# Altium PCB EMG-Arm-ELEC-V2.0.PcbDoc (part 5 of 5)
Units mil, origin at the board's own origin, x right, y up, seen from the top; angles counter-clockwise.
Board outline 8303.83 x 7532.25 mil, 2 copper layers (Top Layer, Bottom Layer), stack 3.556 mil thick; 263 components, 174 nets, 696 pads, 313 vias.
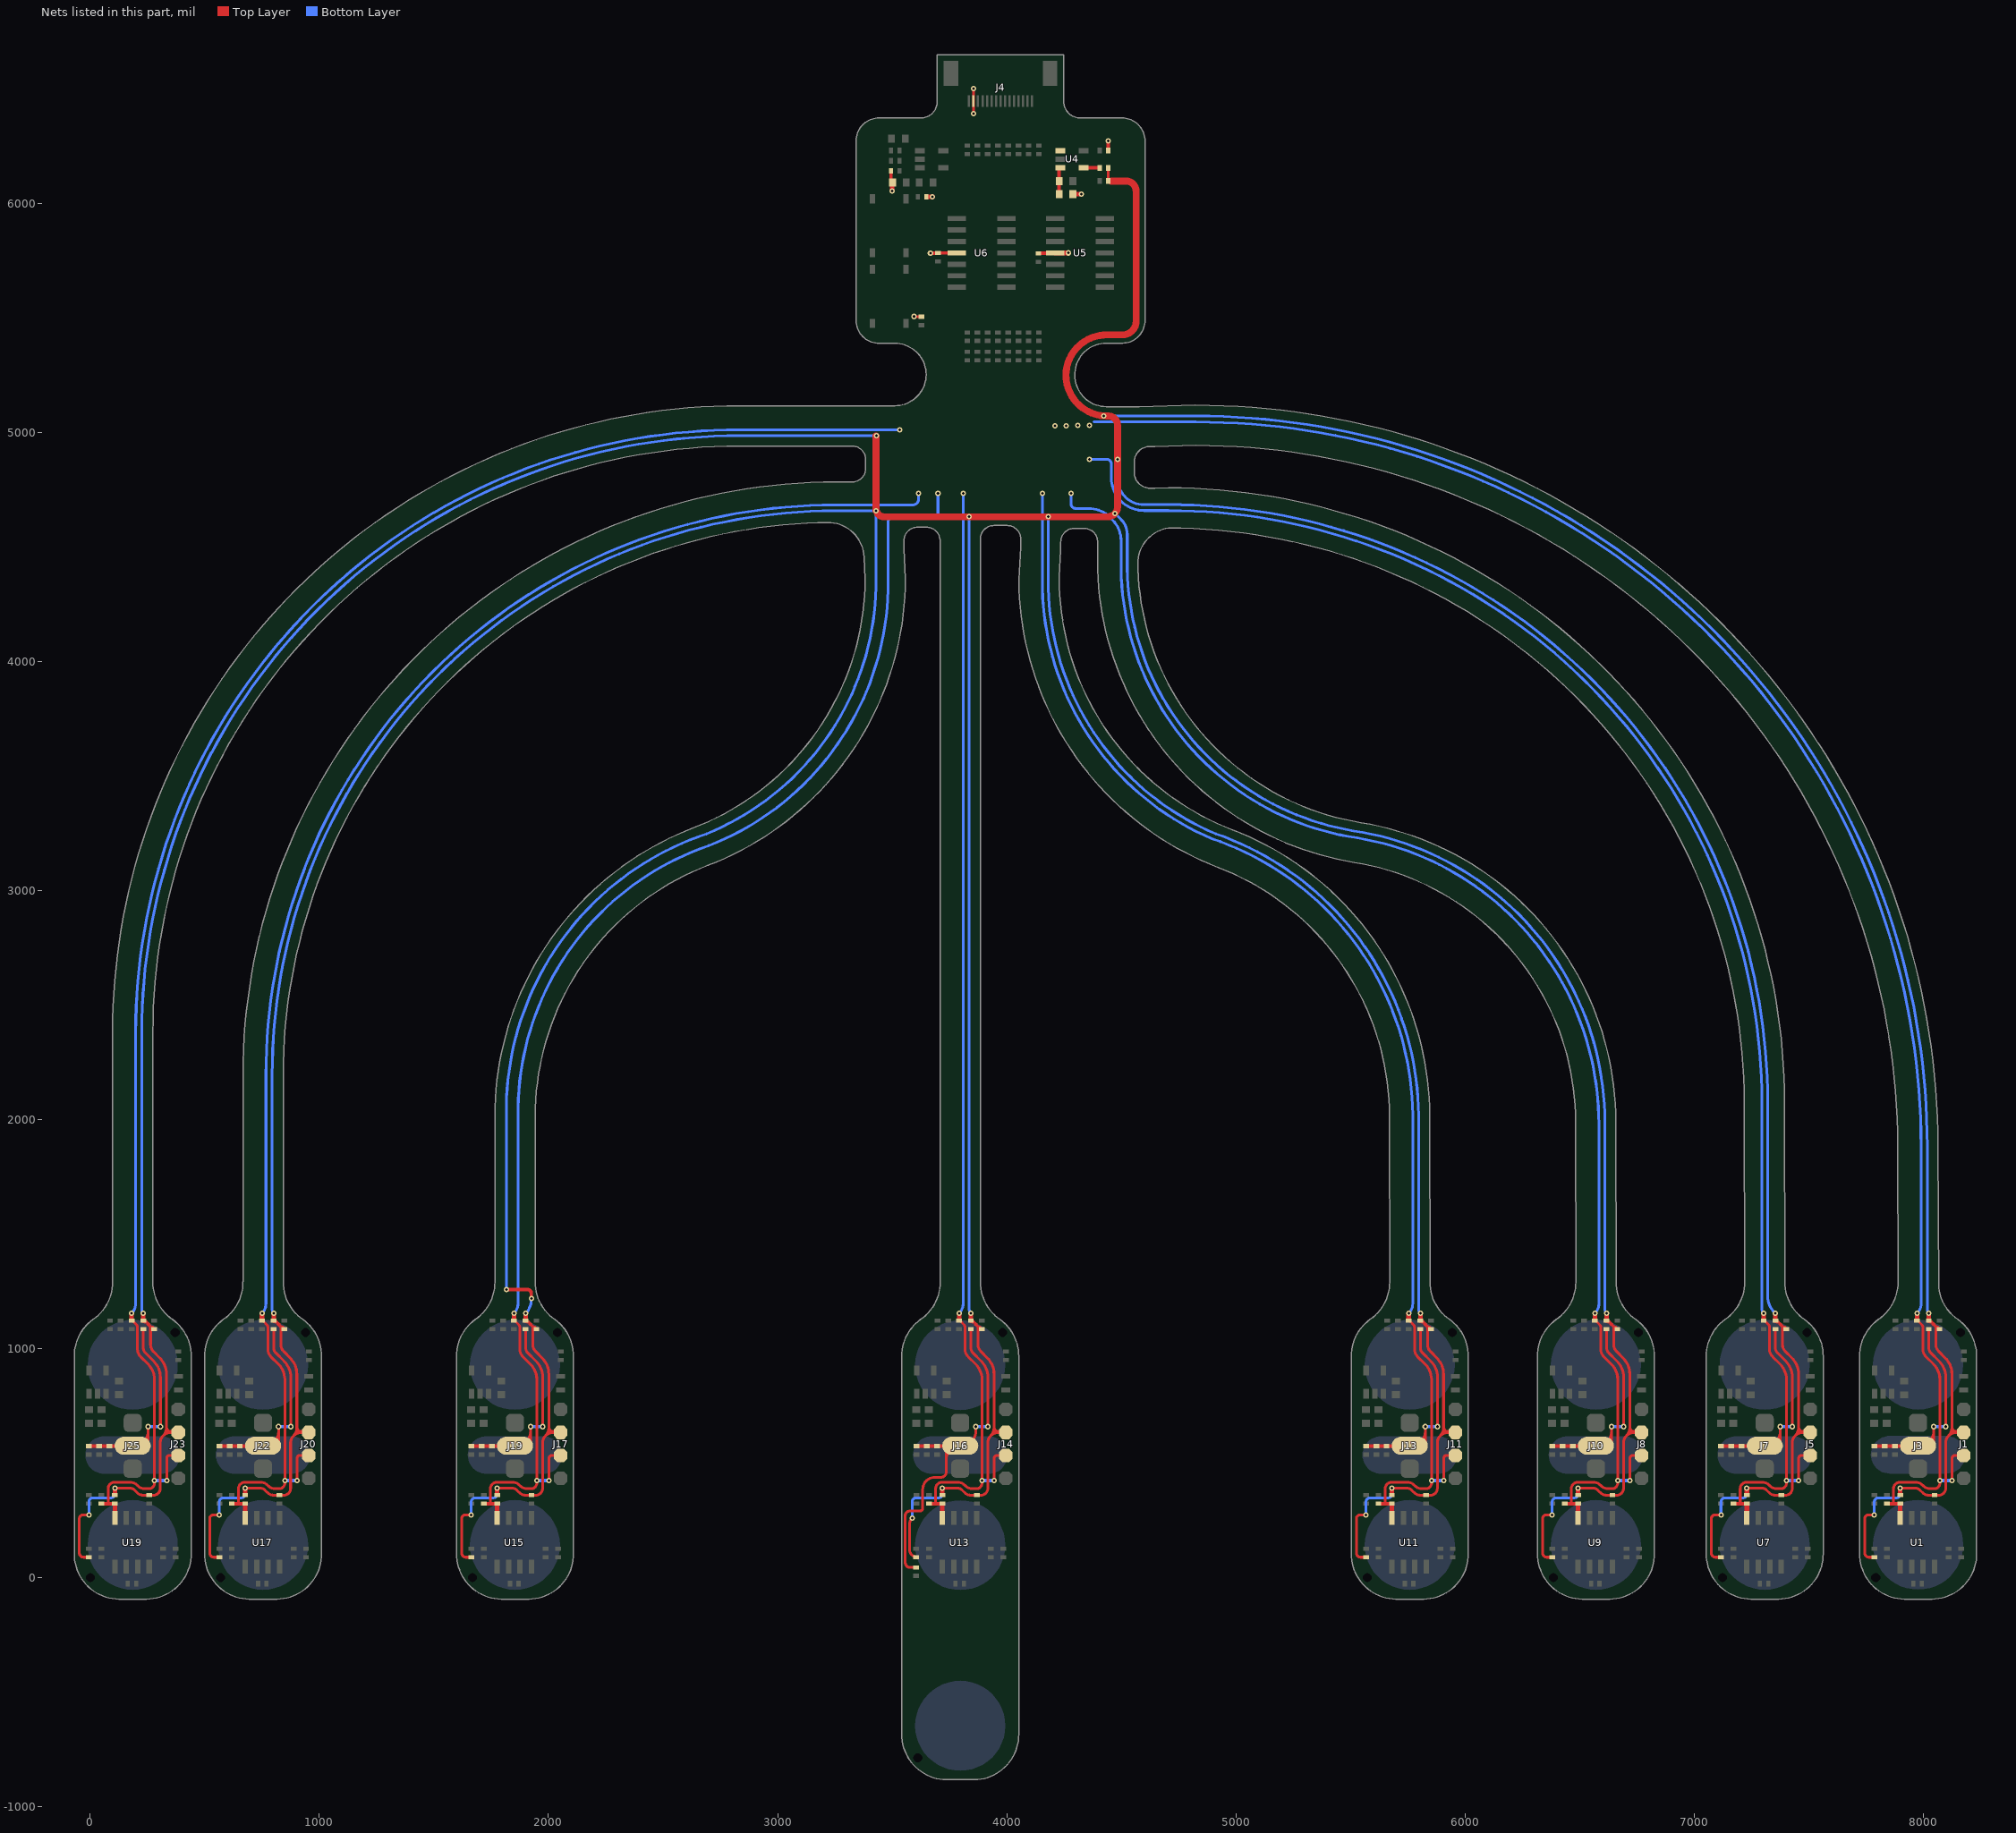
[diagram p4: the nets of this part, all layers, seen from the top]

## Via types
v1: diameter 23.62, hole 11.81, Top Layer to Bottom Layer, tented both sides, 313 vias

## Nets (pads, with @x,y where several pads share a name; then routed paths per layer and width w, separated by ;. In a path a pad name is that pad's centre, name@x,y a point inside that pad or via, vN(x,y) a via of type N, cw(c..) or ccw(c..) an arc to the next point about the centre after c; other vN are vias at no path point) (continued)
VCC_3V3: C1.1 C6.1 C8.1 C9.1 C11.1 C16.1 C21.1 C26.1 C31.1 C36.1 C41.1 J1.3 J4.2 J5.3 J8.3 J11.3 J14.3 J17.3 J20.3 J23.3 R3.1 R5.2 R7.2 R8.2 R11.1 R15.1 R19.1 R23.1 R27.1 R31.1 R35.1 SB9.1 SB10.1 SB103.1 SB203.1 SB303.1 SB403.1 SB503.1 SB603.1 SB703.1 SB803.1 U1.8 U5.4 U6.4 U7.8 U9.8 U11.8 U13.8 U15.8 U17.8 U19.8 | length 52168.8
  Top Layer w11: v1(3855.13,6390.66) v1(3855.13,6500.06)
  Top Layer w12: 77.77,322.06 77.77,387.37 ; 77.77,387.42 cw(c105.84,387.5) 104.02,415.52 107.28,415.73 173.73,415.73 cw(c173.73,371.94) 204.69,402.9 209.33,398.26 ccw(c235.62,424.55) 235.62,387.37 255.66,387.37 ccw(c255.66,411.75) 280.04,411.75 v1(280.04,423.11) 280.04,864.65 ccw(c186.87,864.65) 252.75,930.54 219.74,963.55 219.69,963.59 cw(c252.97,996.92) 205.87,997.02 205.87,1091.39 205.84,1093.61 ccw(c192.84,1093.42) 202.21,1102.43 186.84,1118.42 SB803.1@180.34,1121.42 ; v1@333.46,422.59 v1(333.46,423.11) 333.46,520.32 cw(c346.2,520.32) 346.2,533.06 373.82,533.06 cw(c373.82,527.87) 379.01,527.87 J23.3@384.2,533.06 ; 646.74,322.06 646.74,387.38 ; 646.74,387.42 cw(c674.82,387.5) 672.99,415.52 676.25,415.73 742.71,415.73 ; 742.75,415.73 cw(c742.71,371.95) 773.67,402.9 778.31,398.26 ccw(c804.6,424.55) 804.6,387.38 824.64,387.38 ccw(c824.64,411.75) 849.01,411.75 v1(849.01,423.11) 849.01,864.65 ccw(c755.84,864.65) 821.72,930.54 788.71,963.55 788.67,963.59 cw(c821.95,996.92) 774.85,997.02 774.85,1091.39 774.82,1093.61 ccw(c761.82,1093.42) 771.19,1102.43 755.82,1118.42 SB703.1@749.32,1121.42 ; v1@902.44,422.6 v1(902.44,423.11) 902.44,520.32 cw(c915.17,520.32) 915.17,533.06 942.79,533.06 cw(c942.79,527.87) 947.98,527.87 J20.3@953.17,533.06 ; 1746.52,322.06 1746.52,387.37 ; 1746.52,387.42 cw(c1774.6,387.5) 1772.78,415.52 1776.04,415.73 1842.49,415.73 ; 1842.53,415.73 cw(c1842.49,371.94) 1873.45,402.9 1878.09,398.26 ccw(c1904.38,424.55) 1904.38,387.37 1924.42,387.37 ccw(c1924.42,411.75) 1948.8,411.75 v1(1948.8,423.11) 1948.8,864.65 ccw(c1855.63,864.65) 1921.51,930.54 1888.5,963.55 1888.45,963.59 cw(c1921.73,996.92) 1874.63,997.02 1874.63,1091.39 1874.6,1093.61 ccw(c1861.6,1093.42) 1870.97,1102.43 1855.6,1118.42 SB603.1@1849.1,1121.42 ; v1@2002.22,422.59 v1(2002.22,423.11) 2002.22,520.32 cw(c2014.95,520.32) 2014.95,533.06 2042.58,533.06 cw(c2042.58,527.87) 2047.77,527.87 J17.3@2052.95,533.06 ; SB10.1@3495.04,6141.39 3495.04,6097.33 C6.1@3501.89,6090.49 C6.1@3500.38,6090.49 ; v1(3595.1,5505.61) 3595.65,5505.06 3626.87,5505.06 R8.2@3627.42,5504.51 ; 3690.01,322.06 3690.01,387.38 ; 3690.01,387.42 cw(c3718.09,387.5) 3716.26,415.52 3719.52,415.73 3785.97,415.73 ; 3786.02,415.73 cw(c3785.97,371.95) 3816.93,402.91 3821.57,398.27 ccw(c3847.86,424.55) 3847.86,387.38 3867.91,387.38 ccw(c3867.91,411.75) 3892.28,411.75 v1(3892.28,423.11) 3892.28,864.66 ccw(c3799.11,864.66) 3864.99,930.54 3831.98,963.55 3831.93,963.6 cw(c3865.22,996.92) 3818.12,997.02 3818.12,1091.39 3818.08,1093.61 ccw(c3805.09,1093.42) 3814.46,1102.43 3799.09,1118.42 SB503.1@3792.59,1121.42 ; v1@3945.71,422.6 v1(3945.71,423.11) 3945.71,520.32 cw(c3958.44,520.32) 3958.44,533.06 3986.06,533.06 cw(c3986.06,527.87) 3991.25,527.87 J14.3@3996.44,533.06 ; U5.4@4209.86,5781.55 ccw(c4209.86,5783.05) U5.4@4211.36,5783.05 ; v1(4269.28,5783.05) cw(c4269.28,5781.55) v1@4270.78,5781.55 ; 5652.17,322.06 5652.17,387.37 ; 5652.17,387.42 cw(c5680.25,387.5) 5678.42,415.52 5681.69,415.73 5748.14,415.73 ; 5748.18,415.73 cw(c5748.14,371.94) 5779.1,402.9 5783.74,398.26 ccw(c5810.03,424.55) 5810.03,387.37 5830.07,387.37 ccw(c5830.07,411.75) 5854.45,411.75 v1(5854.45,423.11) 5854.45,864.65 ccw(c5761.27,864.65) 5827.16,930.54 5794.14,963.55 5794.1,963.59 cw(c5827.38,996.92) 5780.28,997.02 5780.28,1091.39 5780.25,1093.61 ccw(c5767.25,1093.42) 5776.62,1102.43 5761.25,1118.42 SB403.1@5754.75,1121.42 ; v1@5907.87,422.59 v1(5907.87,423.11) 5907.87,520.32 cw(c5920.6,520.32) 5920.6,533.06 5948.22,533.06 cw(c5948.22,527.87) 5953.41,527.87 J11.3@5958.6,533.06 ; 6464.89,322.05 6464.89,387.37 ; 6464.89,387.42 cw(c6492.96,387.49) 6491.14,415.51 6494.4,415.72 6560.85,415.72 ; 6560.9,415.72 cw(c6560.85,371.94) 6591.81,402.9 6596.45,398.26 ccw(c6622.74,424.55) 6622.74,387.37 6642.79,387.37 ccw(c6642.79,411.74) 6667.16,411.74 v1(6667.16,423.1) 6667.16,864.65 ccw(c6573.99,864.65) 6639.87,930.53 6606.86,963.54 6606.81,963.59 cw(c6640.09,996.91) 6592.99,997.01 6592.99,1091.38 6592.96,1093.61 ccw(c6579.96,1093.41) 6589.34,1102.42 6573.96,1118.41 SB303.1@6567.46,1121.41 ; v1@6720.58,422.59 v1(6720.58,423.1) 6720.58,520.32 cw(c6733.32,520.32) 6733.32,533.05 6760.94,533.05 cw(c6760.94,527.86) 6766.13,527.86 J8.3@6771.32,533.05 ; 7201.64,322.06 7201.64,387.38 ; 7201.64,387.42 cw(c7229.71,387.5) 7227.89,415.52 7231.15,415.73 7297.6,415.73 ; 7297.64,415.73 cw(c7297.6,371.95) 7328.56,402.91 7333.2,398.26 ccw(c7359.49,424.55) 7359.49,387.38 7379.53,387.38 ccw(c7379.53,411.75) 7403.91,411.75 v1(7403.91,423.11) 7403.91,864.65 ccw(c7310.74,864.65) 7376.62,930.54 7343.61,963.55 7343.56,963.59 cw(c7376.84,996.92) 7329.74,997.02 7329.74,1091.39 7329.71,1093.61 ccw(c7316.71,1093.42) 7326.08,1102.43 7310.71,1118.42 SB203.1@7304.21,1121.42 ; v1@7457.33,422.6 v1(7457.33,423.11) 7457.33,520.32 cw(c7470.07,520.32) 7470.07,533.06 7497.69,533.06 cw(c7497.69,527.87) 7502.88,527.87 J5.3@7508.07,533.06 ; 7871.11,322.05 7871.11,387.37 ; 7871.11,387.42 cw(c7899.19,387.5) 7897.36,415.52 7900.62,415.73 7967.08,415.73 ; 7967.12,415.73 cw(c7967.08,371.94) 7998.04,402.9 8002.68,398.26 ccw(c8028.97,424.55) 8028.97,387.37 8049.01,387.37 ccw(c8049.01,411.75) 8073.38,411.75 v1(8073.38,423.11) 8073.38,864.65 ccw(c7980.21,864.65) 8046.09,930.54 8013.08,963.55 8013.03,963.59 cw(c8046.32,996.92) 7999.22,997.02 7999.22,1091.39 7999.19,1093.61 ccw(c7986.19,1093.42) 7995.56,1102.43 7980.19,1118.42 SB103.1@7973.69,1121.42 ; v1@8126.81,422.59 v1(8126.81,423.11) 8126.81,520.32 cw(c8139.54,520.32) 8139.54,533.06 8167.16,533.06 cw(c8167.16,527.87) 8172.35,527.87 J1.3@8177.54,533.06
  Top Layer w15: R35.1@48.49,322.06 77.77,322.06 C41.1@107.04,322.05 ; R31.1@617.47,322.06 646.74,322.06 C36.1@676.01,322.05 ; R27.1@1717.26,322.06 1746.52,322.06 C31.1@1775.8,322.05 ; R23.1@3660.74,322.06 3690.01,322.06 C26.1@3719.28,322.05 ; v1(3667.01,5782.29) 3699.55,5782.29 cw(c3700.31,5782.29) 3700.31,5783.05 U6.4@3781.36,5783.05 ; C8.1@4138.38,5781.55 U5.4@4209.86,5781.55 ; SB9.1@4443.11,6229.7 v1(4443.11,6272.28) ; R19.1@5622.9,322.06 5652.17,322.06 C21.1@5681.45,322.05 ; R15.1@6435.61,322.05 6464.89,322.05 C16.1@6494.15,322.05 ; R11.1@7172.36,322.06 7201.64,322.06 C11.1@7230.91,322.05 ; R3.1@7841.84,322.06 7871.11,322.05 C1.1@7900.38,322.05
  Top Layer w20: U19.8@107.04,259.35 C41.1@107.04,320.05 ; SB803.1@180.34,1124.42 v1(180.34,1153.05) ; U17.8@676.01,259.35 C36.1@676.01,320.05 ; SB703.1@749.32,1124.42 v1(749.32,1153.05) ; U15.8@1775.8,259.35 C31.1@1775.8,320.05 ; SB603.1@1849.1,1124.42 v1(1849.1,1153.05) ; v1(3500.38,6054.05) C6.1@3500.38,6090.49 ; R7.2@3651.49,6028.1 v1(3676.51,6028.1) ; U13.8@3719.28,259.35 C26.1@3719.28,320.05 ; SB503.1@3792.59,1124.42 v1(3792.59,1153.05) ; U5.4@4211.36,5783.05 v1(4269.28,5783.05) ; R5.2@4289.05,6040.29 v1(4325.38,6040.29) ; U11.8@5681.44,259.35 C21.1@5681.45,320.05 ; SB403.1@5754.75,1124.42 v1(5754.75,1153.05) ; U9.8@6494.16,259.34 C16.1@6494.16,320.04 ; SB303.1@6567.46,1124.41 v1(6567.46,1153.04) ; U7.8@7230.91,259.35 C11.1@7230.91,320.05 ; SB203.1@7304.21,1124.42 v1(7304.21,1153.05) ; U1.8@7900.38,259.35 C1.1@7900.38,320.05 ; SB103.1@7973.69,1124.42 v1(7973.69,1153.05)
  Bottom Layer w12: v1(180.34,1153.05) ccw(c137.5,1195.89) 198.09,1195.89 ; 197.93,1195.52 197.93,2378.94 cw(c2832.03,2376.83) 2834.14,5010.94 v1(3532.7,5010.94) ; 767.06,1195.89 cw(c706.48,1195.89) v1(749.32,1153.05) ccw(c706.85,1195.52) 766.91,1195.52 766.91,2194.35 cw(c3252.81,2197.03) 3250.14,4682.94 3590.27,4682.94 ccw(c3590.27,4708.05) 3615.38,4708.05 v1(3615.38,4733.05) ; v1(1849.1,1153.05) ccw(c1806.26,1195.89) 1866.85,1195.89 ; 1866.91,1196.04 1866.91,2014.97 cw(c3097,2030.82) 2700.07,3195.22 ccw(c2251.82,4341.31) 3482.43,4348.62 3482.43,4609.22 cw(c3507.05,4609.22) 3507.05,4633.84 3688.86,4633.84 ccw(c3688.86,4645.08) 3694.71,4635.49 3698.46,4639.23 ccw(c3688.86,4645.08) 3700.1,4645.08 v1(3700.1,4733.05) ; v1(3792.59,1153.05) ccw(c3750.71,1194.93) 3809.93,1194.93 3809.93,1355.05 3809.93,4561.31 v1(3809.93,4733.05) ; v1(4155.3,4733.05) 4155.3,4353.38 ccw(c5373.93,4346.65) 4895.83,3225.7 cw(c4484.74,2005.3) 5772.43,2019.89 5772.43,1195.74 ; v1(4280.38,4733.05) 4280.38,4688.05 ccw(c4300.77,4688.05) 4300.77,4667.66 4358.16,4667.66 cw(c4358.16,4537.12) 4457.72,4621.56 4460.97,4618.34 cw(c4369.89,4526.5) 4499.23,4526.44 4499.23,4526.38 4499.23,4442.09 ccw(c5707.19,4423.79) 5492.75,3234.88 cw(c5323.01,1987.11) 6271.82,2815.05 cw(c5314.86,1980) 6584.93,1979.18 6584.93,1195.22 cw(c6525.29,1195.22) v1(6567.46,1153.04) ccw(c6524.62,1195.88) 6585.21,1195.88 ; v1(4361.38,4882.47) 4435.5,4882.47 cw(c4435.5,4860.97) 4457.01,4860.97 4457.01,4800.87 ccw(c4599.94,4800.87) 4599.94,4657.94 4706.15,4657.94 cw(c4708.74,2070.33) 7296.34,2072.94 7296.34,1172.05 ccw(c7323.21,1172.05) v1(7304.21,1153.05) ; 4381.38,5044.94 4825.14,5044.94 cw(c4827.28,1880.79) 7991.43,1882.94 7991.43,1195.89 cw(c7930.85,1195.89) v1(7973.69,1153.05) ; v1(5754.75,1153.05) ccw(c5711.91,1195.89) 5772.5,1195.89
  Bottom Layer w15: v1(280.04,423.11) v1(333.46,423.11) ; v1(849.01,423.11) v1(902.44,423.11) ; v1(1948.8,423.11) v1(2002.22,423.11) ; v1(3892.28,423.11) v1(3945.71,423.11) ; v1(5854.45,423.11) v1(5907.87,423.11) ; v1(6667.16,423.1) v1(6720.58,423.1) ; v1(7403.91,423.11) v1(7457.33,423.11) ; v1(8073.38,423.11) v1(8126.81,423.11)
  other v1: 4210.38,5028.55 4260.38,5028.55 4311.23,5029.94 4361.38,5029.94
VREF: SB30.1 U4.1 U4.4 | length 68.8
  Top Layer w15: U4.4@4336.56,6154.9 SB30.1@4405.38,6154.9
VREF-E1: J3.2 SB107.1 SB108.1 SB109.1 SB110.1 | length 899.5
  Top Layer w12: J3.2@7978.35,575 7984.26,575 ccw(c7984.26,636.81) 7987.34,575.07 ccw(c7984.26,636.81) 8012.5,581.83 ccw(c7984.26,636.81) 8039.25,608.57 ccw(c7984.26,636.81) 8046.07,636.81 v1@8046.07,658.22 ; 8024.78,1002.47 ccw(c8056.15,1002.5) 8034.02,980.27 8069.94,944.36 cw(c7999.23,873.65) 8099.23,873.65 8099.23,838.05 v1(8099.23,658.41) ; 8024.78,1002.52 8024.78,1081.42 SB109.1@8024.78,1084.42 ; J3.2@8046.27,574.81 v1@8046.27,658.03
  Top Layer w15: SB110.1@7787.38,573.5 SB107.1@7877.05,573.5 J3.2@7974.73,573.5
  Bottom Layer w12: v1(8045.88,658.41) v1(8099.23,658.41)
VREF-E2: J7.2 SB207.1 SB208.1 SB209.1 SB210.1 | length 899.5
  Top Layer w12: J7.2@7308.87,575 7314.79,575 ccw(c7314.79,636.81) 7317.86,575.07 ccw(c7314.79,636.81) 7343.03,581.83 ccw(c7314.79,636.81) 7369.77,608.57 ccw(c7314.79,636.81) 7376.6,636.81 v1@7376.6,658.22 ; 7355.31,1002.47 ccw(c7386.67,1002.5) 7364.55,980.27 7400.46,944.36 cw(c7329.75,873.65) 7429.75,873.65 7429.75,838.05 v1(7429.75,658.41) ; 7355.31,1002.52 7355.31,1081.42 SB209.1@7355.31,1084.42 ; J7.2@7376.79,574.81 v1@7376.79,658.03
  Top Layer w15: SB210.1@7117.9,573.5 SB207.1@7207.58,573.5 J7.2@7305.25,573.5
  Bottom Layer w12: v1(7376.41,658.41) v1(7429.75,658.41)
VREF-E3: J10.2 SB307.1 SB308.1 SB309.1 SB310.1 | length 899.5
  Top Layer w12: J10.2@6572.12,575 6578.04,574.99 ccw(c6578.04,636.8) 6581.11,575.07 ccw(c6578.04,636.8) 6606.28,581.82 ccw(c6578.04,636.8) 6633.02,608.56 ccw(c6578.04,636.8) 6639.85,636.8 v1@6639.85,658.21 ; 6618.56,1002.47 ccw(c6649.92,1002.5) 6627.8,980.27 6663.71,944.35 cw(c6593,873.64) 6693,873.64 6693,838.04 v1(6693,658.41) ; 6618.56,1002.51 6618.56,1081.41 SB309.1@6618.56,1084.41 ; J10.2@6640.04,574.8 v1@6640.04,658.02
  Top Layer w15: SB310.1@6381.16,573.49 SB307.1@6470.83,573.5 J10.2@6568.5,573.49
  Bottom Layer w12: v1(6639.66,658.41) v1(6693,658.41)
VREF-E4: J13.2 SB407.1 SB408.1 SB409.1 SB410.1 | length 899.5
  Top Layer w12: J13.2@5759.41,575 5765.33,575 ccw(c5765.33,636.81) 5768.4,575.07 ccw(c5765.33,636.81) 5793.57,581.83 ccw(c5765.33,636.81) 5820.31,608.57 ccw(c5765.33,636.81) 5827.14,636.81 v1@5827.14,658.22 ; 5805.85,1002.47 ccw(c5837.21,1002.5) 5815.09,980.27 5851,944.36 cw(c5780.29,873.65) 5880.29,873.65 5880.29,838.05 v1(5880.29,658.41) ; 5805.85,1002.52 5805.85,1081.42 SB409.1@5805.85,1084.42 ; J13.2@5827.33,574.81 v1@5827.33,658.03
  Top Layer w15: SB410.1@5568.45,573.5 SB407.1@5658.12,573.5 J13.2@5755.79,573.5
  Bottom Layer w12: v1(5826.95,658.41) v1(5880.29,658.41)
VREF-E5: J16.2 SB507.1 SB508.1 SB509.1 SB510.1 SB513.1 | length 1553.7
  Top Layer w12: SB507.1@3605,44 3577.73,44 cw(c3577.73,64.48) 3557.25,64.48 3557.25,270.66 cw(c3576.46,270.66) 3576.46,289.86 3619.86,289.86 ccw(c3619.86,303.52) 3633.52,303.52 3633.52,384.05 cw(c3686.55,384.05) 3686.55,437.08 3713.1,437.08 ccw(c3713.1,460.2) 3736.22,460.2 3736.22,514.37 ; J16.2@3737.4,570.22 ccw(c3737.4,569.04) 3736.22,569.04 3736.22,514.37 ; 3843.68,1002.47 ccw(c3875.05,1002.5) 3852.92,980.27 3888.84,944.36 cw(c3818.13,873.65) 3918.13,873.65 3918.13,838.05 v1(3918.13,658.41) ; 3843.68,1002.52 3843.68,1081.42 SB509.1@3843.68,1084.42 ; v1@3864.97,658.22 3864.97,636.81 cw(c3803.16,636.81) 3858.14,608.57 cw(c3803.16,636.81) 3831.4,581.83 cw(c3803.16,636.81) 3806.23,575.07 cw(c3803.16,636.81) 3803.16,575 J16.2@3797.25,575 3796.85,575 ccw(c3796.85,514.37) 3789.48,574.55 ccw(c3796.85,514.37) 3736.22,514.37
  Top Layer w15: SB510.1@3606.28,573.5 J16.2@3737.4,573.5
  Bottom Layer w12: v1(3864.78,658.41) v1(3918.13,658.41)
VREF-E6: J19.2 SB607.1 SB608.1 SB609.1 SB610.1 | length 899.5
  Top Layer w12: J19.2@1853.76,575 1859.68,575 ccw(c1859.68,636.81) 1862.75,575.07 ccw(c1859.68,636.81) 1887.92,581.83 ccw(c1859.68,636.81) 1914.66,608.57 ccw(c1859.68,636.81) 1921.49,636.81 v1@1921.49,658.22 ; 1900.2,1002.47 ccw(c1931.56,1002.5) 1909.44,980.27 1945.35,944.36 cw(c1874.64,873.65) 1974.64,873.65 1974.64,838.05 v1(1974.64,658.41) ; 1900.2,1002.52 1900.2,1081.42 SB609.1@1900.2,1084.42 ; J19.2@1921.68,574.81 v1@1921.68,658.03
  Top Layer w15: SB610.1@1662.8,573.5 SB607.1@1752.47,573.5 J19.2@1850.14,573.5
  Bottom Layer w12: v1(1921.3,658.41) v1(1974.64,658.41)
VREF-E7: J22.2 SB707.1 SB708.1 SB709.1 SB710.1 | length 899.5
  Top Layer w12: J22.2@753.98,575 759.89,575 ccw(c759.89,636.81) 762.97,575.07 ccw(c759.89,636.81) 788.13,581.83 ccw(c759.89,636.81) 814.88,608.57 ccw(c759.89,636.81) 821.71,636.81 v1@821.71,658.22 ; 800.42,1002.47 ccw(c831.78,1002.5) 809.66,980.27 845.57,944.36 cw(c774.86,873.65) 874.86,873.65 874.86,838.05 v1(874.86,658.41) ; 800.42,1002.52 800.42,1081.42 SB709.1@800.42,1084.42 ; J22.2@821.9,574.81 v1@821.9,658.03
  Top Layer w15: SB710.1@563.01,573.5 SB707.1@652.68,573.5 J22.2@750.36,573.5
  Bottom Layer w12: v1(821.51,658.41) v1(874.86,658.41)
VREF-E8: J25.2 SB807.1 SB808.1 SB809.1 SB810.1 | length 899.5
  Top Layer w12: J25.2@185,575 190.92,575 ccw(c190.92,636.81) 193.99,575.07 ccw(c190.92,636.81) 219.16,581.83 ccw(c190.92,636.81) 245.9,608.57 ccw(c190.92,636.81) 252.73,636.81 v1@252.73,658.22 ; 231.44,1002.47 ccw(c262.8,1002.5) 240.68,980.27 276.59,944.36 cw(c205.88,873.65) 305.88,873.65 305.88,838.05 v1(305.88,658.41) ; 231.44,1002.52 231.44,1081.42 SB809.1@231.44,1084.42 ; J25.2@252.92,574.81 v1@252.92,658.03
  Top Layer w15: SB810.1@-5.97,573.5 SB807.1@83.71,573.5 J25.2@181.38,573.5
  Bottom Layer w12: v1(252.54,658.41) v1(305.88,658.41)
VREF_GND: C1.2 C2.2 C11.2 C12.2 C16.2 C17.2 C21.2 C22.2 C26.2 C27.2 C31.2 C32.2 C36.2 C37.2 C41.2 C42.2 J1.2 J5.2 J8.2 J11.2 J14.2 J17.2 J20.2 J23.2 SB28.1 SB30.2 SB101.1 SB109.2 SB111.1 SB201.1 SB209.2 SB211.1 SB301.1 SB309.2 SB311.1 SB401.1 SB409.2 SB411.1 SB501.1 SB509.2 SB511.1 SB601.1 SB609.2 SB611.1 SB701.1 SB709.2 SB711.1 SB801.1 SB809.2 SB811.1 | length 55854.6
  Top Layer w12: SB801.1@-5.99,88.17 -29.46,88.17 cw(c-29.46,106.67) -47.96,106.67 -47.96,257.09 cw(c-32,257.09) -32,273.05 v1(-5.96,273.05) ; v1(107.04,389.95) 173.73,389.95 cw(c173.73,364.07) 192.02,382.39 ; 192.04,382.37 203.87,370.54 ccw(c231.6,398.26) 231.6,359.05 C42.2@257.04,359.05 275.84,359.05 ccw(c275.84,388.56) 305.35,388.56 305.35,589.51 cw(c343.53,589.51) 316.53,616.51 ccw(c277.73,655.31) 327.89,633.06 ccw(c277.73,655.31) 329.05,635.88 ccw(c277.73,655.31) 331.97,646.98 ccw(c365.57,680.58) J23.2@365.57,633.06 ; 265.14,1092.77 ccw(c270.86,1087.1) 262.8,1087.1 262.8,1016.59 ccw(c305.77,1016.59) 275.39,986.2 303.32,958.27 cw(c232.6,887.56) 332.6,887.56 332.6,658.41 ; 319.15,619.32 cw(c352.57,585.53) 352.57,633.06 J23.2@365.57,633.06 ; 332.6,637.77 332.6,658.41 ; 343.03,636.9 345.74,636.9 ; J23.2@356.03,636.9 345.74,636.9 ; J23.2@356.78,634.23 cw(c356.78,658.41) 354.67,634.33 cw(c356.78,658.41) 345.74,636.9 ; J23.2@384.2,633.06 J23.2@365.57,633.06 ; SB701.1@562.99,88.17 539.51,88.17 cw(c539.51,106.67) 521.01,106.67 521.01,257.09 cw(c536.97,257.09) 536.97,273.05 v1(563.01,273.05) ; v1(676.01,389.95) 742.71,389.95 cw(c742.71,364.07) 760.99,382.39 772.85,370.54 ccw(c800.58,398.26) 800.58,359.05 C37.2@826.01,359.05 844.82,359.05 ccw(c844.82,388.56) 874.33,388.56 874.33,589.51 cw(c912.51,589.51) 885.51,616.51 ccw(c846.71,655.31) 896.87,633.06 ccw(c846.71,655.31) 898.03,635.88 ccw(c846.71,655.31) 900.94,646.98 ccw(c934.55,680.58) J20.2@934.55,633.06 ; 834.12,1092.77 ccw(c839.84,1087.1) 831.78,1087.1 831.78,1016.59 ccw(c874.75,1016.59) 844.36,986.2 872.29,958.28 cw(c801.58,887.56) 901.58,887.56 901.58,658.41 ; 888.12,619.32 cw(c921.55,585.53) 921.55,633.06 J20.2@934.55,633.06 ; 901.58,637.77 901.58,658.41 ; 912,636.9 914.72,636.9 ; J20.2@925,636.9 914.72,636.9 ; J20.2@925.76,634.23 cw(c925.76,658.41) 923.64,634.33 cw(c925.76,658.41) 914.72,636.9 ; J20.2@953.17,633.06 J20.2@934.55,633.06 ; SB601.1@1662.77,88.17 1639.3,88.17 cw(c1639.3,106.67) 1620.8,106.67 1620.8,257.09 cw(c1636.76,257.09) 1636.76,273.05 v1(1662.8,273.05) ; v1(1775.8,389.95) 1842.49,389.95 cw(c1842.49,364.07) 1860.78,382.39 ; 1860.8,382.37 1872.63,370.54 ccw(c1900.36,398.26) 1900.36,359.05 C32.2@1925.8,359.05 1944.6,359.05 ccw(c1944.6,388.56) 1974.11,388.56 1974.11,589.51 cw(c2012.29,589.51) 1985.29,616.51 ccw(c1946.49,655.31) 1996.65,633.06 ccw(c1946.49,655.31) 1997.81,635.88 ccw(c1946.49,655.31) 2000.73,646.98 ccw(c2034.33,680.58) J17.2@2034.33,633.06 ; 1933.9,1092.77 ccw(c1939.62,1087.1) 1931.56,1087.1 1931.56,1016.59 ccw(c1974.53,1016.59) 1944.15,986.2 1972.08,958.27 cw(c1901.36,887.56) 2001.36,887.56 2001.36,658.41 ; 1987.91,619.32 cw(c2021.33,585.53) 2021.33,633.06 J17.2@2034.33,633.06 ; 2001.36,637.77 2001.36,658.41 ; 2011.79,636.9 2014.5,636.9 ; J17.2@2024.79,636.9 2014.5,636.9 ; J17.2@2025.54,634.23 cw(c2025.54,658.41) 2023.43,634.33 cw(c2025.54,658.41) 2014.5,636.9 ; J17.2@2052.95,633.06 J17.2@2034.33,633.06 ; v1(3587.92,259.87) ccw(c3616.07,231.71) 3576.25,231.71 3576.25,119.68 ccw(c3605,119.68) 3593.58,93.3 3598.5,91.17 SB501.1@3605,88.17 ; v1(3719.28,389.96) 3785.97,389.96 cw(c3785.97,364.07) 3804.26,382.39 3816.12,370.54 ccw(c3843.84,398.27) 3843.84,359.05 C27.2@3869.28,359.05 3888.09,359.05 ccw(c3888.09,388.56) 3917.59,388.56 3917.59,589.51 cw(c3955.78,589.51) 3928.78,616.51 ; 3877.38,1092.77 ccw(c3883.11,1087.1) 3875.05,1087.1 3875.05,1016.59 ccw(c3918.02,1016.59) 3887.63,986.2 3915.56,958.28 cw(c3844.85,887.57) 3944.85,887.57 3944.85,658.41 ; 3928.79,616.52 ccw(c3889.98,655.31) 3940.13,633.06 ccw(c3889.98,655.31) 3941.29,635.88 ccw(c3889.98,655.31) 3944.21,646.98 ccw(c3977.82,680.58) J14.2@3977.82,633.06 ; 3931.39,619.32 cw(c3964.82,585.53) 3964.82,633.06 J14.2@3977.82,633.06 ; 3944.85,637.77 3944.85,658.41 ; 3955.27,636.9 3957.98,636.9 ; J14.2@3968.27,636.9 3957.98,636.9 ; J14.2@3969.03,634.23 cw(c3969.03,658.41) 3966.91,634.33 cw(c3969.03,658.41) 3957.98,636.9 ; J14.2@3996.44,633.06 J14.2@3977.82,633.06 ; SB28.1@4443.11,6097.01 SB30.2@4443.11,6154.18 ; SB401.1@5568.42,88.17 5544.95,88.17 cw(c5544.95,106.67) 5526.45,106.67 5526.45,257.09 cw(c5542.4,257.09) 5542.4,273.05 v1(5568.45,273.05) ; v1(5681.45,389.95) 5748.14,389.95 cw(c5748.14,364.07) 5766.43,382.39 ; 5766.45,382.37 5778.28,370.54 ccw(c5806.01,398.26) 5806.01,359.05 C22.2@5831.45,359.05 5850.25,359.05 ccw(c5850.25,388.56) 5879.76,388.56 5879.76,589.51 cw(c5917.94,589.51) 5890.94,616.51 ccw(c5852.14,655.31) 5902.3,633.06 ccw(c5852.14,655.31) 5903.46,635.88 ccw(c5852.14,655.31) 5906.38,646.98 ccw(c5939.98,680.58) J11.2@5939.98,633.06 ; 5839.55,1092.77 ccw(c5845.27,1087.1) 5837.21,1087.1 5837.21,1016.59 ccw(c5880.18,1016.59) 5849.8,986.2 5877.72,958.28 cw(c5807.01,887.56) 5907.01,887.56 5907.01,658.41 ; 5893.56,619.32 cw(c5926.98,585.53) 5926.98,633.06 J11.2@5939.98,633.06 ; 5907.01,637.77 5907.01,658.41 ; 5917.43,636.9 5920.15,636.9 ; J11.2@5930.43,636.9 5920.15,636.9 ; J11.2@5931.19,634.23 cw(c5931.19,658.41) 5929.08,634.33 cw(c5931.19,658.41) 5920.15,636.9 ; J11.2@5958.6,633.06 J11.2@5939.98,633.06 ; SB301.1@6381.13,88.16 6357.66,88.16 cw(c6357.66,106.66) 6339.16,106.66 6339.16,257.09 cw(c6355.12,257.09) 6355.12,273.04 v1(6381.16,273.04) ; v1(6494.16,389.95) 6560.85,389.95 cw(c6560.85,364.06) 6579.14,382.39 6590.99,370.53 ccw(c6618.72,398.26) 6618.72,359.04 C17.2@6644.16,359.04 6662.96,359.04 ccw(c6662.96,388.55) 6692.47,388.55 6692.47,589.51 cw(c6730.65,589.51) 6703.65,616.51 ; 6652.26,1092.76 ccw(c6657.98,1087.09) 6649.92,1087.09 6649.92,1016.58 ccw(c6692.89,1016.58) 6662.51,986.2 6690.44,958.27 cw(c6619.73,887.56) 6719.73,887.56 6719.73,658.41 ; 6703.66,616.52 ccw(c6664.85,655.31) 6715.01,633.05 ccw(c6664.85,655.31) 6716.17,635.88 ccw(c6664.85,655.31) 6719.09,646.97 ccw(c6752.69,680.58) J8.2@6752.69,633.05 ; 6706.27,619.31 cw(c6739.69,585.53) 6739.69,633.05 J8.2@6752.69,633.05 ; 6719.73,637.77 6719.73,658.41 ; 6730.15,636.9 6732.86,636.9 ; J8.2@6743.15,636.9 6732.86,636.9 ; J8.2@6743.91,634.23 cw(c6743.91,658.41) 6741.79,634.32 cw(c6743.91,658.41) 6732.86,636.9 ; J8.2@6771.32,633.05 J8.2@6752.69,633.05 ; SB201.1@7117.88,88.17 7094.41,88.17 cw(c7094.41,106.67) 7075.91,106.67 7075.91,257.09 cw(c7091.87,257.09) 7091.87,273.05 v1(7117.91,273.05) ; v1(7230.91,389.96) 7297.6,389.96 cw(c7297.6,364.07) 7315.89,382.39 7327.74,370.54 ccw(c7355.47,398.26) 7355.47,359.05 C12.2@7380.91,359.05 7399.71,359.05 ccw(c7399.71,388.56) 7429.22,388.56 7429.22,589.51 cw(c7467.4,589.51) 7440.4,616.51 ccw(c7401.6,655.31) 7451.76,633.06 ccw(c7401.6,655.31) 7452.92,635.88 ccw(c7401.6,655.31) 7455.84,646.98 ccw(c7489.44,680.58) J5.2@7489.44,633.06 ; 7389.01,1092.77 ccw(c7394.73,1087.1) 7386.67,1087.1 7386.67,1016.59 ccw(c7429.64,1016.59) 7399.26,986.2 7427.19,958.28 cw(c7356.47,887.57) 7456.47,887.57 7456.47,658.41 ; 7443.02,619.32 cw(c7476.44,585.53) 7476.44,633.06 J5.2@7489.44,633.06 ; 7456.47,637.77 7456.47,658.41 ; 7466.9,636.9 7469.61,636.9 ; J5.2@7479.9,636.9 7469.61,636.9 ; J5.2@7480.65,634.23 cw(c7480.65,658.41) 7478.54,634.33 cw(c7480.65,658.41) 7469.61,636.9 ; J5.2@7508.07,633.06 J5.2@7489.44,633.06 ; SB101.1@7787.36,88.17 7763.88,88.17 cw(c7763.88,106.67) 7745.38,106.67 7745.38,257.09 cw(c7761.34,257.09) 7761.34,273.05 v1(7787.38,273.05) ; v1(7900.38,389.95) 7967.08,389.95 cw(c7967.08,364.07) 7985.36,382.39 ; 7985.38,382.37 7997.22,370.54 ccw(c8024.95,398.26) 8024.95,359.05 C2.2@8050.38,359.05 8069.19,359.05 ccw(c8069.19,388.56) 8098.69,388.56 8098.69,589.51 cw(c8136.88,589.51) 8109.88,616.51 ; 8058.48,1092.77 ccw(c8064.21,1087.09) 8056.15,1087.09 8056.15,1016.59 ccw(c8099.12,1016.59) 8068.73,986.2 8096.66,958.27 cw(c8025.95,887.56) 8125.95,887.56 8125.95,658.41 ; 8109.89,616.52 ccw(c8071.08,655.31) 8121.23,633.06 ccw(c8071.08,655.31) 8122.39,635.88 ccw(c8071.08,655.31) 8125.31,646.98 ccw(c8158.92,680.58) J1.2@8158.92,633.06 ; 8112.49,619.32 cw(c8145.92,585.53) 8145.92,633.06 J1.2@8158.92,633.06 ; 8125.95,637.77 8125.95,658.41 ; 8136.37,636.9 8139.08,636.9 ; J1.2@8149.37,636.9 8139.08,636.9 ; J1.2@8150.13,634.23 cw(c8150.13,658.41) 8148.01,634.32 cw(c8150.13,658.41) 8139.08,636.9 ; J1.2@8177.54,633.06 J1.2@8158.92,633.06 ; 332.6,658.41 ccw(c356.78,658.41) 341.82,639.42 ccw(c356.78,658.41) 345.74,636.9 ; 901.58,658.41 ccw(c925.76,658.41) 910.8,639.42 ccw(c925.76,658.41) 914.72,636.9 ; 2001.36,658.41 ccw(c2025.54,658.41) 2010.58,639.42 ccw(c2025.54,658.41) 2014.5,636.9 ; 3944.85,658.41 ccw(c3969.03,658.41) 3954.07,639.42 ccw(c3969.03,658.41) 3957.98,636.9 ; 5907.01,658.41 ccw(c5931.19,658.41) 5916.23,639.42 ccw(c5931.19,658.41) 5920.15,636.9 ; 6719.73,658.41 ccw(c6743.91,658.41) 6728.94,639.41 ccw(c6743.91,658.41) 6732.86,636.9 ; 7456.47,658.41 ccw(c7480.65,658.41) 7465.69,639.42 ccw(c7480.65,658.41) 7469.61,636.9 ; 8125.95,658.41 ccw(c8150.13,658.41) 8135.17,639.42 ccw(c8150.13,658.41) 8139.08,636.9
  Top Layer w15: SB809.2@239.03,1115.42 244.12,1115.42 ; 251.62,1106.33 259.99,1097.96 265.14,1092.77 267.49,1090.42 SB811.1@271.76,1090.42 ; SB709.2@808,1115.42 813.09,1115.42 ; 820.59,1106.33 828.97,1097.96 ; 828.97,1097.92 834.12,1092.77 836.47,1090.42 SB711.1@840.74,1090.42 ; v1(1815.73,1257.01) 1908.35,1257.01 cw(c1908.35,1240.2) 1925.16,1240.2 v1(1925.16,1218.15) ; SB609.2@1907.79,1115.42 1912.88,1115.42 ; 1920.38,1106.33 1928.75,1097.96 1933.9,1092.77 1936.25,1090.42 SB611.1@1940.52,1090.42 ; SB509.2@3851.27,1115.42 3856.36,1115.42 ; 3863.86,1106.33 3872.23,1097.96 ; 3872.23,1097.92 3877.38,1092.77 3879.73,1090.42 SB511.1@3884.01,1090.42 ; SB409.2@5813.44,1115.42 5818.53,1115.42 ; 5826.03,1106.33 5834.4,1097.96 ; 5834.4,1097.92 5839.55,1092.77 5841.9,1090.42 SB411.1@5846.17,1090.42 ; SB309.2@6626.15,1115.41 6631.24,1115.41 ; 6638.74,1106.33 6647.11,1097.96 6652.26,1092.76 6654.61,1090.41 SB311.1@6658.88,1090.41 ; SB209.2@7362.9,1115.42 7367.99,1115.42 ; 7375.49,1106.33 7383.86,1097.96 ; 7383.86,1097.92 7389.01,1092.77 7391.36,1090.42 SB211.1@7395.63,1090.42 ; SB109.2@8032.37,1115.42 8037.46,1115.42 ; 8044.96,1106.33 8053.33,1097.96 8058.48,1092.77 8060.83,1090.42 SB111.1@8065.11,1090.42
  Top Layer w20: C41.2@107.04,361.91 v1(107.04,389.95) ; SB809.2@231.44,1121.42 v1(231.44,1153.05) ; C36.2@676.01,361.91 v1(676.01,389.95) ; SB709.2@800.42,1121.42 v1(800.42,1153.05) ; C31.2@1775.8,361.91 v1(1775.8,389.95) ; SB609.2@1900.2,1121.42 v1(1900.2,1153.05) ; C26.2@3719.28,361.91 v1(3719.28,389.96) ; SB509.2@3843.68,1121.42 v1(3843.68,1153.05) ; 4258.77,5249.91 4258.78,5250.04 ; C21.2@5681.45,361.91 v1(5681.45,389.95) ; SB409.2@5805.85,1121.42 v1(5805.85,1153.05) ; C16.2@6494.16,361.91 v1(6494.16,389.95) ; SB309.2@6618.56,1121.41 v1(6618.56,1153.04) ; C11.2@7230.91,361.91 v1(7230.91,389.96) ; SB209.2@7355.31,1121.42 v1(7355.31,1153.05) ; C1.2@7900.38,361.91 v1(7900.38,389.95) ; SB109.2@8024.78,1121.42 v1(8024.78,1153.05)
  Top Layer w30: v1@3429.77,4658.05 v1@3429.77,4983.98 ; v1@3430.73,4663.7 ccw(c3463.12,4663.7) 3463.12,4631.31 v1(3836.22,4631.31) v1(4181.64,4631.31) 4440.64,4631.31 ccw(c4440.64,4674.99) 4484.32,4674.99 4484.34,4789.79 v1(4484.35,4882.47) 4484.38,5029.59 ccw(c4442.92,5029.59) 4442.92,5071.05 ; 4258.77,5249.91 ccw(c4437.63,5249.91) 4437.63,5071.05 ; 4258.78,5250.04 cw(c4436.26,5247.75) 4436.26,5425.25 4505.58,5425.25 ccw(c4505.58,5484.63) 4564.96,5484.63 4564.96,6053.35 ccw(c4521.79,6053.35) 4553.95,6082.15 ccw(c4521.79,6053.35) 4521.79,6096.52 4456.67,6096.52
  Bottom Layer w12: v1(-5.96,273.05) -5.96,330.02 cw(c11.26,330.02) 11.26,347.24 89,347.24 ccw(c89,365.27) 107.04,365.27 v1(107.04,389.95) ; v1(231.44,1153.05) cw(c248.65,1170.27) 224.31,1170.27 224.31,2379.72 cw(c2831.83,2377.41) 2834.14,4984.94 v1(3430.73,4984.94) ; v1(563.01,273.05) 563.01,330.02 cw(c580.23,330.02) 580.23,347.24 657.98,347.24 ccw(c657.98,365.27) 676.01,365.27 v1(676.01,389.95) ; v1(800.42,1153.05) cw(c817.63,1170.27) 793.28,1170.27 793.28,1336.76 793.91,2195.32 cw(c3252.32,2198.53) 3249.14,4656.94 3427.42,4656.94 ccw(c3427.42,4660.4) v1@3428.93,4657.28 ; v1(1662.8,273.05) 1662.8,330.02 cw(c1680.02,330.02) 1680.02,347.24 1757.76,347.24 ccw(c1757.76,365.27) 1775.8,365.27 v1(1775.8,389.95) ; v1(1815.73,1257.01) 1815.73,2018 cw(c3093.37,2034.23) 2688.77,3246.23 ccw(c2240.22,4347.96) 3429.7,4360.09 v1@3428.93,4657.28 ; v1(1900.2,1153.05) ccw(c1839.93,1213.31) 1925.16,1213.31 v1(1925.16,1218.15) ; v1(3429.87,4657.95) cw(c3427.42,4660.4) v1@3428.93,4657.28 ; v1(3587.92,259.87) 3587.92,331.75 cw(c3603.4,331.75) 3603.4,347.24 3701.25,347.24 ccw(c3701.25,365.27) 3719.28,365.27 v1(3719.28,389.96) ; v1(3836.22,4631.31) 3836.22,4560.62 3836.55,1355.05 3836.55,1170.27 ccw(c3860.9,1170.27) v1(3843.68,1153.05) ; v1(4181.64,4631.31) 4181.64,4354.86 ccw(c5377.34,4348.61) 4914.27,3246.2 cw(c4482.4,2003.02) 5798.38,2017.44 5798.38,1171.08 ccw(c5823.87,1171.08) v1(5805.85,1153.05) ; v1(4424.38,5071.54) 4424.38,5071.05 4484.38,5071.05 4484.5,5070.94 4825.14,5070.94 cw(c4827.08,1879.64) 8018.38,1881.58 8018.38,1168.51 ccw(c8040.24,1168.51) v1(8024.78,1153.05) ; v1(4472.97,4645.62) 4499.6,4618.99 cw(c4435.32,4554.72) 4499.63,4618.96 cw(c4435.32,4554.72) 4526.22,4554.72 4526.22,4442.81 ccw(c5708.01,4425.65) 5515.71,3259.48 cw(c5323.24,1986.09) 6611.09,1988.33 6611.26,1339.69 6611.26,1170.67 ccw(c6636.18,1170.67) v1(6618.56,1153.04) ; v1(4484.35,4882.47) 4484.35,4798.04 ccw(c4598.45,4798.04) 4598.45,4683.94 4706.14,4683.94 cw(c4708.53,2070.54) 7321.93,2072.94 7321.93,1227.85 ccw(c7421.93,1227.85) 7351.22,1157.14 v1(7355.31,1153.05) ; v1(5568.45,273.05) 5568.45,330.02 cw(c5585.67,330.02) 5585.67,347.24 5663.41,347.24 ccw(c5663.41,365.27) 5681.45,365.27 v1(5681.45,389.95) ; v1(6381.16,273.04) 6381.16,330.01 cw(c6398.38,330.01) 6398.38,347.23 6476.12,347.23 ccw(c6476.12,365.27) 6494.16,365.27 v1(6494.16,389.95) ; v1(7117.91,273.05) 7117.91,330.02 cw(c7135.13,330.02) 7135.13,347.24 7212.87,347.24 ccw(c7212.87,365.27) 7230.91,365.27 v1(7230.91,389.96) ; v1(7787.38,273.05) 7787.38,330.02 cw(c7804.6,330.02) 7804.6,347.24 7882.35,347.24 ccw(c7882.35,365.27) 7900.38,365.27 v1(7900.38,389.95)
VS+1: R5.1 R6.1 U4.3 | length 117.2
  Top Layer w15: R5.1@4229.05,6040.29 R6.1@4229.05,6096.29 4229.05,6150.59 4233.36,6154.9 U4.3@4234.2,6154.9
pads on no net: J4.3 J4.4 J4.5 SW1.1 SW1.4 SW2.1 SW2.4

## Polygon pours and split planes (outlines as drawn)
no net on Top Overlay "NONET_L01_P-001" (solid): 3688.08,-483.22 3688.08,-666.95 3907.13,-666.95 3906.89,-483.22 cw(c3797.49,-646.95) 3994.41,-646.95 cw(c3797.49,-646.95) 3797.49,-843.87 cw(c3797.49,-646.95) 3600.57,-646.95 cw(c3797.49,-646.95)
no net on Top Overlay "NONET_L01_P-001" (solid): 3670.38,-618.01 3670.38,-263.01 cw(c3770.38,-263.01) 3770.38,-163.01 3830.38,-163.01 cw(c3830.38,-263.01) 3930.38,-263.01 3930.38,-618.01 cw(c3830.38,-618.01) 3830.38,-718.01 3770.38,-718.01 cw(c3770.38,-618.01)
VCC_3V3 on Top Layer "VCC_3V3_L01_P007" (hatched 45Degree grid 20 track 8, remove dead copper, pour order 7): 4364.72,5047.37 cw(c4361.97,5019.1) 4390.38,5019.1 4390.38,4978.05 4390.38,4726.84 cw(c4372.81,4726.83) 4372.81,4709.26 3539.17,4709.26 cw(c3539.17,4736.17) 3512.26,4736.17 3512.26,5036.94 cw(c3530.02,5036.94) 3530.02,5054.69 3655.26,5054.69 ccw(c3655.26,5115.81) 3716.38,5115.81 3716.38,5198.38 cw(c3741.05,5198.38) 3741.05,5223.05 4200.27,5223.05 cw(c4200.08,5193.23) 4229.77,5196.08 ccw(c4385.07,5201.43)
GND on Top Layer "GND_L01_P001" (hatched 45Degree grid 20 track 8, remove dead copper, pour order 1): 3371.97,5417.62 ccw(c3443.37,5489.02) 3443.37,5388.05 4431.46,5388.05 ccw(c4431.46,5391.83) 4434.13,5389.16 4505.79,5389.16 ccw(c4505.79,5486.35) 4574.52,5417.62 ccw(c4503.84,5488.3) 4603.79,5488.3 4603.79,6272.28 ccw(c4503.75,6272.28) 4574.49,6343.03 ccw(c4503.81,6272.35) 4503.81,6372.3 4321.09,6372.3 cw(c4321.09,6443.82) 4249.58,6443.82 4249.58,6638.05 3696.9,6638.05 3696.9,6443.82 cw(c3625.39,6443.82) 3625.39,6372.3 3442.67,6372.3 ccw(c3442.67,6272.35) 3371.99,6343.03 ccw(c3442.74,6272.28) 3342.69,6272.28 3342.69,5488.3 ccw(c3442.64,5488.3)
VREF on Top Layer "VREF_L01_P000" (solid, remove dead copper, pour order 0): 4296.39,6241.52 4296.39,6166.71 4358.22,6166.71 4358.22,6143.09 4280.17,6143.09 4280.17,6217.89 4212.55,6217.89 4212.55,6241.52
VCC_3V3 on Bottom Layer "VCC_3V3_L02_P006" (hatched 45Degree grid 20 track 8, remove dead copper, pour order 6): 3690.38,5516.78 3690.38,5489.13 cw(c3682.38,5489.13) 3682.38,5481.13 3582.8,5481.13 cw(c3582.8,5492.01) 3571.92,5492.01 3571.92,6013.1 ccw(c3552.67,6013.1) 3552.67,6032.35 3394,6032.35 cw(c3394,6063.97) 3362.38,6063.98 3362.38,6292.01 cw(c3403.42,6292.01) 3403.42,6333.05 3818.25,6333.05 ccw(c3818.25,6351.33) 3836.54,6351.33 cw(c3843.38,6351.33) 3843.38,6358.18 3853.91,6358.18 cw(c3853.91,6352) 3860.08,6352 3860.08,6312.06 cw(c3846.93,6312.06) 3846.93,6298.91 3437.41,6298.9 ccw(c3434.88,6273.05) 3408.91,6273.05 3408.91,6119.52 ccw(c3425.07,6119.52) 3425.07,6103.36 3663.26,6103.36 cw(c3663.26,6076.24) 3690.38,6076.24
VCC_3V3 on Bottom Layer "VCC_3V3_L02_P004" (hatched 45Degree grid 20 track 8, remove dead copper, pour order 4): 3845.55,6298.85 4132.88,6298.86 cw(c4132.9,6277.48) 4154.28,6277.46 4154.28,5055.05 ccw(c4200.27,5055.04) 4200.28,5009.05 4369.04,5009.05 ccw(c4369.05,5053.42) 4413.42,5053.43 4413.42,5061.07 ccw(c4369.67,5061.11) 4369.62,5104.87 cw(c4395.37,5221.04) 4276.38,5221.05 4276.38,5269.45 cw(c4432.59,5269.46) 4432.59,5425.66 4512.57,5425.66 ccw(c4512.57,5487.58) 4574.49,5487.58 4574.49,6272.28 ccw(c4497.74,6272.3) 4497.72,6349.05 4293.78,6349.05 cw(c4293.77,6425.44) 4217.38,6425.44 4217.38,6485.05 ccw(c4186.38,6485.05) 4186.38,6516.05 3855.13,6516.05 ccw(c3855.11,6497.47) 3836.54,6497.45 3836.54,6308.05 ccw(c3845.15,6307.47)
GND on Bottom Layer "GND_L02_P005" (hatched 45Degree grid 20 track 8, remove dead copper, pour order 5): 3740.38,6638.05 ccw(c3740.38,6607.03) 3709.37,6607.03 3709.37,6369.45 ccw(c3735.38,6369.45) 3735.38,6343.43 3811.87,6343.43 ccw(c3811.87,6353.29) 3821.73,6353.29 3821.73,6409.66 ccw(c3806.38,6409.66) 3806.38,6425.01 3783.63,6425.01 cw(c3783.63,6440.08) 3768.56,6440.08 3768.56,6523.29 cw(c3787.37,6523.29) 3787.37,6542.1 4196.43,6542.1 ccw(c4196.62,6563.23) 4217.75,6563.05 4217.75,6621.37 ccw(c4201.07,6621.37) 4201.07,6638.05

## Other copper
Top Layer:
  rectangle net VREF_GND: 4433.38,6077.11 4488.82,6167.4
  rectangle net -VCC_3V3: 3431.32,6167.92 3514.48,6243.48
  rectangle net GND_ELEC5: 3669.87,882.58 3708.39,951.85
  rectangle net GND_ELEC5: 3563.04,942.64 3687.39,964.73
  rectangle net NetC29_2: 3595.07,780.22 3622.35,823.52
  rectangle net VREF_GND: 3831.18,1100.42 3870.5,1130.42
  region net VREF_GND: 3903.28,1105.42 3864.73,1105.42 3864.73,1075.42 3903.28,1075.42
  rectangle net NetC28_2: 3632.94,718.04 3678.24,748.04
  region net #rg5: 3782.01,77.26 3757.47,77.26 3757.47,16.24 3782.01,16.24
  rectangle net *rg5: 3806.55,16.24 3831.09,77.26
  rectangle net *rg8: 194.31,16.24 218.85,77.26
  region net #rg8: 169.77,77.26 145.23,77.26 145.23,16.24 169.77,16.24
  rectangle net NetC43_2: 20.69,718.04 65.99,748.04
  region net VREF_GND: 291.04,1105.42 252.49,1105.42 252.49,1075.42 291.04,1075.42
  rectangle net VREF_GND: 218.94,1100.42 258.25,1130.42
  rectangle net NetC44_2: -17.18,780.22 10.11,823.52
  rectangle net GND_ELEC8: -49.21,942.64 75.14,964.73
  rectangle net GND_ELEC8: 57.63,882.58 96.15,951.84
  rectangle net *rg7: 763.28,16.24 787.82,77.26
  region net #rg7: 738.74,77.26 714.2,77.26 714.2,16.24 738.74,16.24
  rectangle net NetC38_2: 589.67,718.04 634.97,748.04
  region net VREF_GND: 860.01,1105.42 821.47,1105.42 821.47,1075.42 860.01,1075.42
  rectangle net VREF_GND: 787.92,1100.42 827.23,1130.42
  rectangle net NetC39_2: 551.8,780.22 579.08,823.52
  rectangle net GND_ELEC7: 519.77,942.64 644.12,964.73
  rectangle net GND_ELEC7: 626.6,882.58 665.12,951.85
  rectangle net *rg6: 1863.07,16.24 1887.61,77.26
  region net #rg6: 1838.53,77.26 1813.99,77.26 1813.99,16.24 1838.53,16.24
  rectangle net NetC33_2: 1689.45,718.04 1734.75,748.04
  region net VREF_GND: 1959.8,1105.42 1921.25,1105.42 1921.25,1075.42 1959.8,1075.42
  rectangle net VREF_GND: 1887.7,1100.42 1927.01,1130.42
  rectangle net NetC34_2: 1651.58,780.22 1678.87,823.52
  rectangle net GND_ELEC6: 1619.55,942.64 1743.9,964.73
  rectangle net GND_ELEC6: 1726.39,882.58 1764.91,951.84
  rectangle net *rg4: 5768.71,16.24 5793.26,77.26
  region net #rg4: 5744.18,77.26 5719.63,77.26 5719.63,16.24 5744.18,16.24
  rectangle net NetC23_2: 5595.1,718.04 5640.4,748.04
  region net VREF_GND: 5865.44,1105.42 5826.9,1105.42 5826.9,1075.42 5865.44,1075.42
  rectangle net VREF_GND: 5793.35,1100.42 5832.66,1130.42
  rectangle net NetC24_2: 5557.23,780.22 5584.51,823.52
  rectangle net GND_ELEC4: 5525.2,942.64 5649.55,964.73
  rectangle net GND_ELEC4: 5632.04,882.58 5670.55,951.84
  rectangle net *rg3: 6581.43,16.23 6605.97,77.26
  region net #rg3: 6556.89,77.26 6532.35,77.26 6532.35,16.23 6556.89,16.23
  rectangle net NetC18_2: 6407.81,718.04 6453.11,748.04
  region net VREF_GND: 6678.16,1105.41 6639.61,1105.41 6639.61,1075.41 6678.16,1075.41
  rectangle net VREF_GND: 6606.06,1100.41 6645.37,1130.41
  rectangle net NetC19_2: 6369.95,780.21 6397.23,823.52
  rectangle net GND_ELEC3: 6337.91,942.64 6462.27,964.72
  rectangle net GND_ELEC3: 6444.75,882.57 6483.27,951.84
  rectangle net *rg2: 7318.18,16.24 7342.72,77.26
  region net #rg2: 7293.64,77.26 7269.1,77.26 7269.1,16.24 7293.64,16.24
  rectangle net NetC13_2: 7144.56,718.04 7189.86,748.04
  region net VREF_GND: 7414.91,1105.42 7376.36,1105.42 7376.36,1075.42 7414.91,1075.42
  rectangle net VREF_GND: 7342.81,1100.42 7382.12,1130.42
  rectangle net NetC14_2: 7106.69,780.22 7133.98,823.52
  rectangle net GND_ELEC2: 7074.66,942.64 7199.01,964.73
  rectangle net GND_ELEC2: 7181.5,882.58 7220.02,951.85
  rectangle net GND_ELEC1: 7850.97,882.58 7889.49,951.84
  rectangle net GND_ELEC1: 7744.14,942.64 7868.49,964.72
  rectangle net NetC4_2: 7776.17,780.22 7803.45,823.52
  rectangle net VREF_GND: 8012.28,1100.42 8051.6,1130.42
  region net VREF_GND: 8084.38,1105.42 8045.83,1105.42 8045.83,1075.42 8084.38,1075.42
  rectangle net NetC3_2: 7814.04,718.04 7859.34,748.04
  region net #rg1: 7963.11,77.26 7938.57,77.26 7938.57,16.24 7963.11,16.24
  rectangle net *rg1: 7987.65,16.24 8012.19,77.26

## Silkscreen, mask and mechanical layers (free items; w line width, h text height)
Top Overlay:
  drawing of 163 lines, arcs and shapes, not listed
  text "Rev-v2.0" at 4575.98,5650.66 h35 r90
  text "ELECTRODE # 8" at 229.79,1299.07 h100 r90
  text "ELECTRODE # 7" at 797.79,1299.07 h100 r90
  text "ELECTRODE # 6" at 1897.79,1299.07 h100 r90
  text "ELECTRODE # 3" at 6615.79,1299.07 h100 r90
  text "ELECTRODE # 2" at 7352.79,1299.07 h100 r90
  text "ELECTRODE # 1" at 8021.85,1299.07 h100 r90
  text "ELECTRODE # 4" at 5803.79,1297.24 h100 r90
  text "ELECTRODE # 5" at 3840.79,1296.3 h100 r90
  text "*" at 242.64,648.57 h30
  text "*" at 811.62,648.57 h30
  text "*" at 1911.4,648.57 h30
  text "*" at 3854.89,648.58 h30
  text "*" at 5817.05,648.57 h30
  text "*" at 6629.76,648.57 h30
  text "*" at 7366.51,648.57 h30
  text "*" at 8035.99,648.57 h30
  text "*" at -58.8,261.49 h30
  text "*" at 510.18,261.49 h30
  text "*" at 1609.96,261.49 h30
  text "*" at 3553.45,261.49 h30
  text "*" at 5515.61,261.49 h30
  text "*" at 6328.32,261.48 h30
  text "*" at 7065.07,261.49 h30
  text "*" at 7734.55,261.49 h30
  text "-REF" at 3845.38,-556.38 h180 r90
  text "V" at 3887.64,-731.19 h300 r90
Board Outline:
  drawing of 187 lines, arcs and shapes, not listed
Fabrication:
  drawing of 906 lines, arcs and shapes, not listed
  text "Layer" at 9779.75,6871.1 h60
  text "Name" at 10189.66,6871.1 h60
  text "Material" at 11119.4,6871.1 h60
  text "Thickness" at 11979.17,6871.1 h60
  text "Constant" at 12629.01,6871.1 h60
  text "Flex Layer Stack" at 13198.87,6871.1 h60
  text "Top Overlay" at 10189.66,6751.1 h60
  text "Top Solder" at 10189.66,6631.1 h60
  text "Solder Resist" at 11119.4,6631.1 h60
  text "0.013mm" at 11979.17,6631.1 h60
  text "3.5" at 12629.01,6631.1 h60
  text "1" at 9779.75,6511.1 h60
  text "Top Layer" at 10189.66,6511.1 h60
  text "0.035mm" at 11979.17,6511.1 h60
  text "Dielectric 1" at 10189.66,6391.1 h60
  text "Flex" at 11119.4,6391.1 h60
  text "0.020mm" at 11979.17,6391.1 h60
  text "4.8" at 12629.01,6391.1 h60
  text "2" at 9779.75,6271.1 h60
  text "Bottom Layer" at 10189.66,6271.1 h60
  text "0.035mm" at 11979.17,6271.1 h60
  text "Bottom Solder" at 10189.66,6151.1 h60
  text "Solder Resist" at 11119.4,6151.1 h60
  text "0.013mm" at 11979.17,6151.1 h60
  text "3.5" at 12629.01,6151.1 h60
  text "Bottom Overlay" at 10189.66,6031.1 h60
  text "Stiffener Area" at 1039.86,5993.66 h60
  text "Stiffener Area" at 3578.86,5928.66 h60
  text "Total board thickness:" at 9779.75,5911.1 h60
  text "0.116mm" at 11979.17,5911.1 h60
  text "Material : FR4" at 1037.51,5888.87 h60
  text "Material : FR4" at 3576.51,5823.87 h60
  text "Thickness : 0.20mm" at 931,5783 h60
  text "Thickness : 0.20mm" at 3470,5718 h60
  text "Stiffener Area" at 3567.58,4923.05 h60
  text "Stiffener Area" at 12861,4864 h60
  text "Thickness : 0.25mm" at 3446.58,4814.05 h60
  text "Thickness : 0.25mm" at 12740,4755 h60
  text "Material : Polyimide" at 3420.43,4700.21 h60
  text "Material : Polyimide" at 12713.86,4641.16 h60
  text "Material : Polyimide" at 203.63,1205.47 h60 r90
  text "Material : Polyimide" at 774.06,1205.47 h60 r90
  text "Material : Polyimide" at 1890.7,1205.47 h60 r90
  text "Material : Polyimide" at 3827.7,1205.47 h60 r90
  text "Material : Polyimide" at 5772.81,1205.47 h60 r90
  text "Material : Polyimide" at 6580.31,1205.47 h60 r90
  text "Material : Polyimide" at 7325.96,1205.47 h60 r90
  text "Material : Polyimide" at 7997.7,1205.47 h60 r90
  text "Cut-out" at 89.06,924.85 h30
  text "Cut-out" at 658.03,924.85 h30
  text "Cut-out" at 1757.82,924.85 h30
  text "Cut-out" at 3701.3,924.85 h30
  text "Cut-out" at 5663.47,924.85 h30
  text "Cut-out" at 6476.18,924.85 h30
  text "Cut-out" at 7212.93,924.85 h30
  text "Cut-out" at 7882.4,924.85 h30
  text "Cut-out" at 4477.44,909.71 h30
  text "Material" at -8.5,657.46 h60
  text "Material" at 560.48,657.46 h60
  text "Material" at 1660.26,657.46 h60
  text "Material" at 3603.75,657.47 h60
  text "Material" at 5565.91,657.46 h60
  text "Material" at 6378.62,657.46 h60
  text "Material" at 7115.37,657.47 h60
  text "Material" at 7784.85,657.46 h60
  text "Cut-out" at 7893,525.71 h30
  text "Cut-out" at 97.37,524.33 h30
  text "Cut-out" at 666.35,524.33 h30
  text "Cut-out" at 1766.13,524.33 h30
  text "Cut-out" at 3709.61,524.33 h30
  text "Cut-out" at 5671.78,524.33 h30
  text "Cut-out" at 6484.49,524.33 h30
  text "Cut-out" at 7221.24,524.33 h30
  text "Cut-out" at 4497.44,519.71 h30
  text "FR4" at 114.12,367.41 h60
  text "FR4" at 683.1,367.41 h60
  text "FR4" at 1782.88,367.41 h60
  text "FR4" at 3726.36,367.41 h60
  text "FR4" at 5688.53,367.41 h60
  text "FR4" at 6501.24,367.4 h60
  text "FR4" at 7237.99,367.41 h60
  text "FR4" at 7907.46,367.41 h60
  text "Cut-out" at 105,131.8 h30
  text "Cut-out" at 673.98,131.8 h30
  text "Cut-out" at 1773.76,131.8 h30
  text "Cut-out" at 3717.24,131.8 h30
  text "Cut-out" at 5679.41,131.8 h30
  text "Cut-out" at 6492.12,131.8 h30
  text "Cut-out" at 7228.87,131.8 h30
  text "Cut-out" at 7898.35,131.8 h30
  text "Cut-out" at 4493.38,116.66 h30
  text "Stiffener Area" at 4951,-193 h60 r90
  text "Thickness : 0.20mm" at 5058,-193 h60 r90
  text "Material : FR4" at 5161.42,-193 h60 r90
  text "Material" at 3587.72,-212.04 h60
  text "FR4" at 3729.72,-324.62 h60
  text "Cut-out" at 85.2,-570.3 h30
  text "Cut-out" at 654.17,-570.29 h30
  text "Cut-out" at 1753.96,-570.3 h30
  text "Cut-out" at 5659.61,-570.29 h30
  text "Cut-out" at 6472.32,-570.3 h30
  text "Cut-out" at 7209.07,-570.29 h30
  text "Cut-out" at 7958.54,-570.3 h30
  text "Cut-out" at 3717.24,-656.61 h30
  text "Cut-out" at 4493.38,-671.75 h30
  text "Cut-out" at 105.2,-960.3 h30
  text "Cut-out" at 674.17,-960.29 h30
  text "Cut-out" at 1773.96,-960.3 h30
  text "Cut-out" at 5679.61,-960.29 h30
  text "Cut-out" at 6492.32,-960.3 h30
  text "Cut-out" at 7229.07,-960.29 h30
  text "Cut-out" at 7978.54,-960.3 h30
  text "Cut-out" at 101.14,-1363.34 h30
  text "Cut-out" at 670.12,-1363.34 h30
  text "Cut-out" at 1769.9,-1363.34 h30
  text "Cut-out" at 5675.55,-1363.34 h30
  text "Cut-out" at 6488.26,-1363.35 h30
  text "Cut-out" at 7225.01,-1363.34 h30
  text "Cut-out" at 7974.49,-1363.34 h30
  text "Stiffener Area" at 6924.08,-1364.89 h60 r90
  text "Material : FR4" at 7026.28,-1376.31 h60 r90
  text "Stiffener Area" at 5230.31,-1382 h60 r90
  text "Material : FR4" at 5332.5,-1382 h60 r90
  text "Stiffener Area" at 8410.31,-1382 h60 r90
  text "Material : FR4" at 8512.5,-1382 h60 r90
  text "Thickness : 0.20mm" at 8614,-1382 h60 r90
  text "Stiffener Area" at 7652.72,-1383.82 h60 r90
  text "Thickness : 0.20mm" at 5434,-1391.8 h60 r90
  text "Thickness : 0.20mm" at 6264.25,-1391.8 h60 r90
  text "Material : FR4" at 7754.91,-1395.24 h60 r90
  text "Stiffener Area" at -344,-1412 h60 r90
  text "Thickness : 0.20mm" at -237,-1412 h60 r90
  text "Material : FR4" at -133.58,-1412 h60 r90
  text "Stiffener Area" at 1118,-1412 h60 r90
  text "Thickness : 0.20mm" at 1225,-1412 h60 r90
  text "Material : FR4" at 1328.42,-1412 h60 r90
  text "Stiffener Area" at 2215,-1412 h60 r90
  text "Thickness : 0.20mm" at 2322,-1412 h60 r90
  text "Material : FR4" at 2425.42,-1412 h60 r90
Drill Drawing:
  circle w10: c48.88,8371.38 r33.33
  lines w10: 15.54,8188.05 82.21,8188.05 82.21,8254.72 15.54,8254.72 15.54,8188.05
  lines w15: -44.25,8143.05 10586.8,8143.05 ; -44.25,8443.05 10586.8,8443.05 ; 506.63,7993.05 506.63,8593.05 ; 1106.47,7993.05 1106.47,8593.05 ; 2196.15,7993.05 2196.15,8593.05 ; 2702.03,7993.05 2702.03,8593.05 ; 3435.83,7993.05 3435.83,8593.05 ; 4935.38,7993.05 4935.38,8593.05 ; 5525.23,7993.05 5525.23,8593.05 ; 6271.03,7993.05 6271.03,8593.05 ; 7020.82,7993.05 7020.82,8593.05 ; 7874.58,7993.05 7874.58,8593.05 ; 9208.19,7993.05 9208.19,8593.05 ; -44.25,7993.05 10586.8,7993.05 10586.8,8593.05 -44.25,8593.05 -44.25,7993.05
  text "Symbol" at 45.75,8488.05 h72
  text "Count" at 551.63,8488.05 h72
  text "Hole Size" at 1151.47,8488.05 h72
  text "Plated" at 2241.15,8488.05 h72
  text "Hole Type" at 2747.03,8488.05 h72
  text "Drill Layer Pair" at 3480.83,8488.05 h72
  text "Via/Pad" at 4980.38,8488.05 h72
  text "Pad Shape" at 5570.23,8488.05 h72
  text "Template" at 6316.03,8488.05 h72
  text "Description" at 7065.82,8488.05 h72
  text "Hole Tolerance (+)" at 7919.58,8488.05 h72
  text "Hole Tolerance (-)" at 9253.19,8488.05 h72
  text "16" at 551.63,8338.05 h60
  text "39.37mil (1.000mm)" at 1151.47,8338.05 h60
  text "NPTH" at 2241.15,8338.05 h60
  text "Round" at 2747.03,8338.05 h60
  text "Top Layer - Bottom Layer" at 3480.83,8338.05 h60
  text "Pad" at 4980.38,8338.05 h60
  text "Rounded" at 5570.23,8338.05 h60
  text "c0hn100" at 6316.03,8338.05 h60
  text "313" at 551.63,8188.05 h60
  text "11.81mil (0.300mm)" at 1151.47,8188.05 h60
  text "PTH" at 2241.15,8188.05 h60
  text "Round" at 2747.03,8188.05 h60
  text "Top Layer - Bottom Layer" at 3480.83,8188.05 h60
  text "Via" at 4980.38,8188.05 h60
  text "Rounded" at 5570.23,8188.05 h60
  text "v60h30m0mx0" at 6316.03,8188.05 h60
  text "329 Total" at 551.63,8038.05 h60

## Dimensions
370.49,1069.27 to 0,0 on Dimension
3612.24,-788.41 to 3982.73,1069.27 on Dimension
3696.9,6649.05 to 3472.26,5388.05 on Dimension
4249.58,6649.05 to 8039.21,-94.79 on Dimension
-99.28,672.03 to 8204.57,674.24 on Dimension